# Altium PCB External_Camera_HAT.PcbDoc (part 2 of 3)
Units mm, origin at the board's own origin, x right, y up, seen from the top; angles counter-clockwise.
Board outline 65 x 56 mm, 4 copper layers (Top Layer, GND Top, GND Bottom, Bottom Layer), stack 1.586 mm thick; 123 components, 112 nets, 537 pads, 357 vias.
Unrouted connection lines stored in the file: 85.
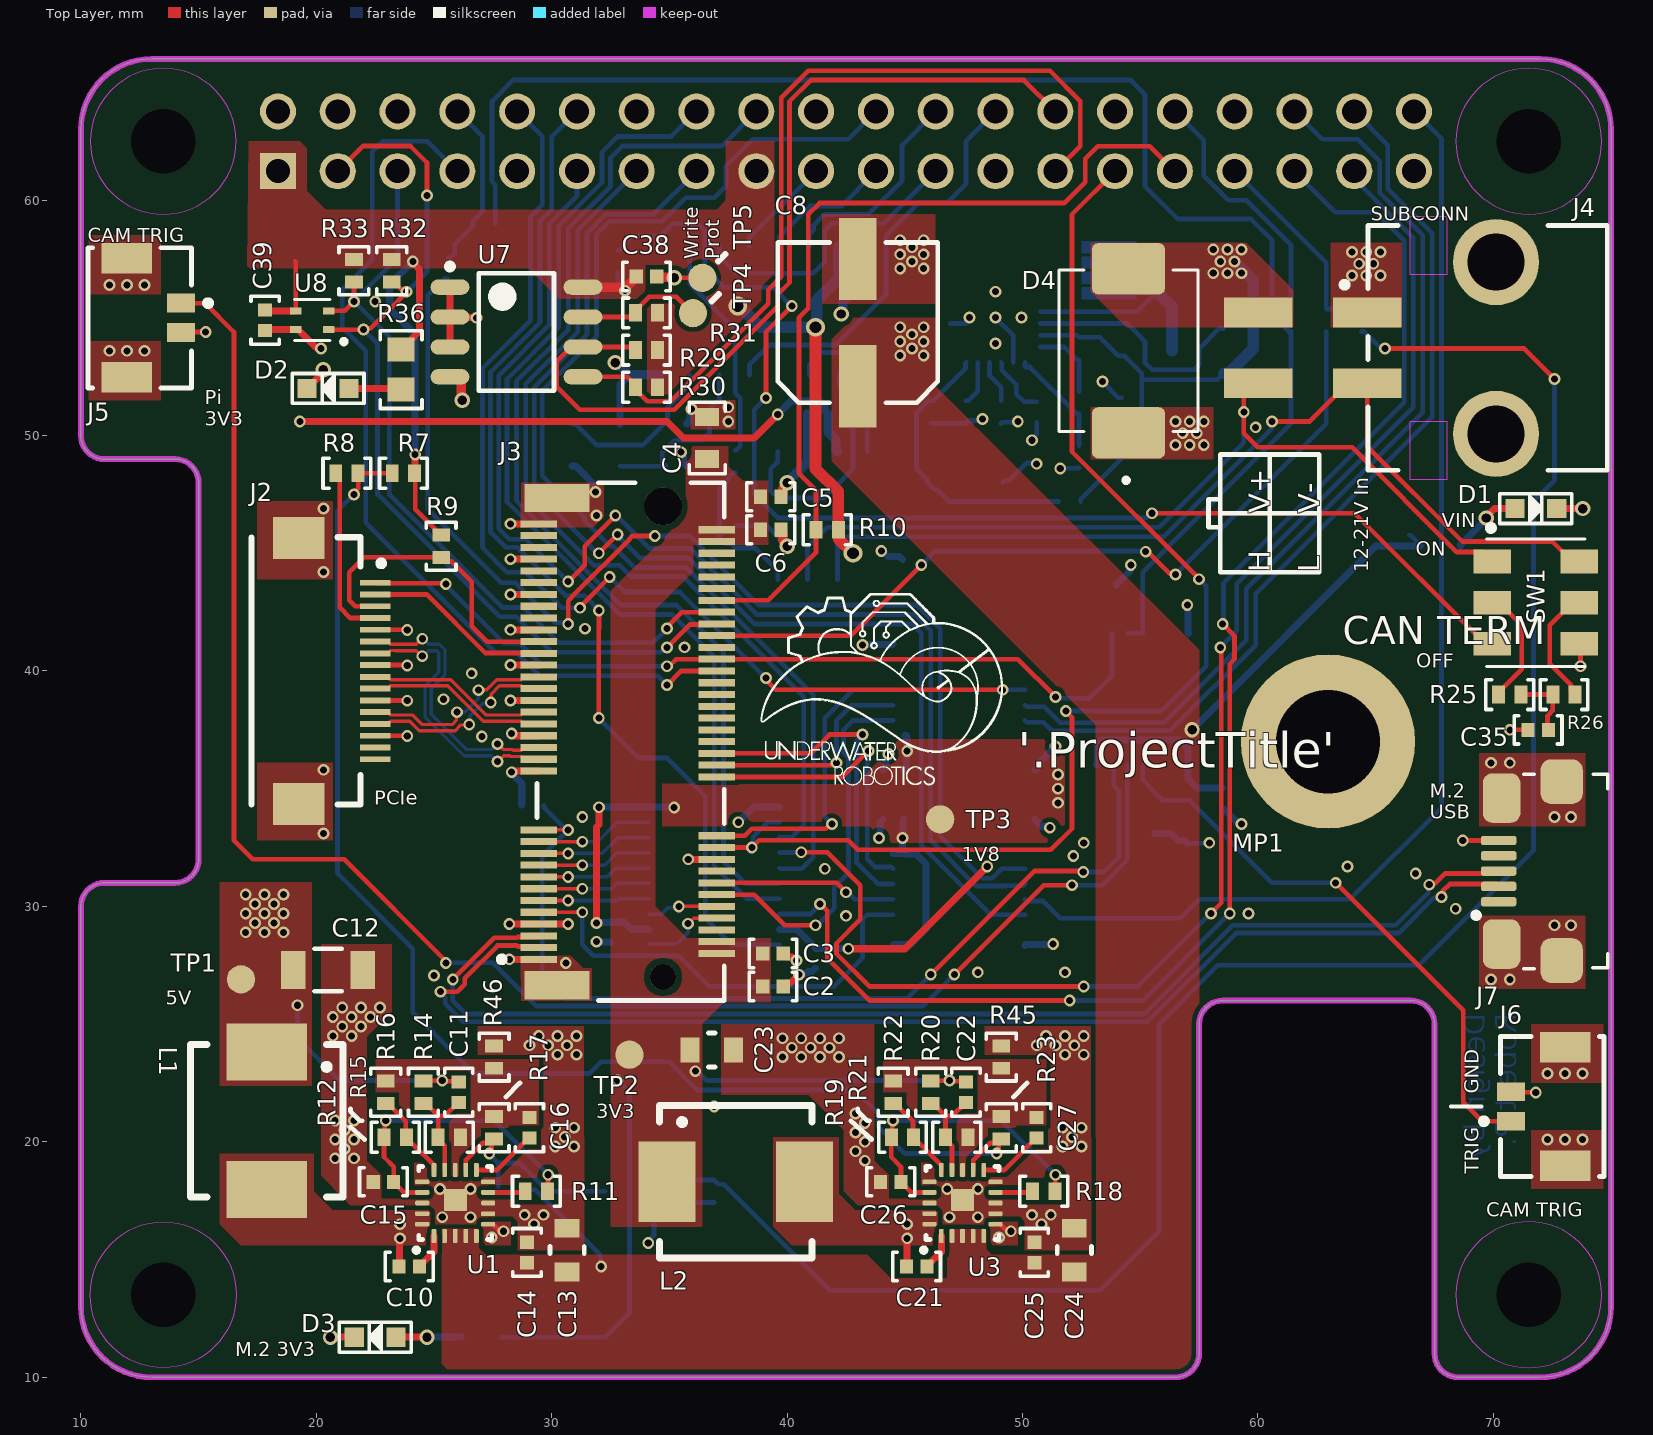
[diagram p0: Top Layer view]

## Via types
v1: diameter 0.5, hole 0.3, Top Layer to Bottom Layer, tented both sides, 342 vias
v2: diameter 0.65, hole 0.4, Top Layer to Bottom Layer, tented both sides, 12 vias
v3: diameter 0.8, hole 0.5, Top Layer to Bottom Layer, tented both sides, 3 vias

## Nets (pads, with @x,y where several pads share a name; then routed paths per layer and width w, separated by ;. In a path a pad name is that pad's centre, name@x,y a point inside that pad or via, vN(x,y) a via of type N, cw(c..) or ccw(c..) an arc to the next point about the centre after c; other vN are vias at no path point) (continued)
CAM_TRIGGER_3V3: R2.1 R4.1 U11.3 U11.4 | length 64.2
  Bottom Layer w0.2: R2.1@27.6,59 27.6,60.654 27.465,60.789 27.465,64.211 28.354,65.1 54.6,65.1 55.2,64.5 55.2,60.6 56.6,59.2 59.7,59.2 60.6,58.3 60.6,55.125 61.3,54.425 R4.1@61.4,54.425 61.4,50.5 55.1,44.2 U11.4@55.1,41.6 U11.3@54.45,41.6
CAN_INT: J1.26 U5.4 | length 17.9
  Bottom Layer w0.2: U5.4@38.4,52.575 38.4,53 39.243,53.843 42.043,53.843 44.2,56 44.2,58.5 45.6,59.9 46.8,59.9 47.6,60.7 47.6,62.52 J1.26@48.85,63.77
CANH: J4.4 SW1.1 U6.7 | length 38.3
  Top Layer w0.2: J4.4@60.011,52.221 59.935,52.221 59.4,51.686 v1(59.4,51) 59.4,50.1 60,49.5 64,49.5 68.45,45.05 69.55,45.05 SW1.1@69.95,44.65
  Bottom Layer w0.2: U6.7@40.865,43.875 40.865,45.256 41.709,46.1 55.8,46.1 59.4,49.7 v1(59.4,51)
CANL: J4.2 SW1.4 U6.6 | length 40.7
  Top Layer w0.2: v1(60.6,50.6) 62.194,50.6 63.816,52.221 J4.2@64.641,52.221 64.641,49.532 68.673,45.5 72.5,45.5 73.35,44.65 SW1.4@73.65,44.65
  Bottom Layer w0.2: U6.6@42.135,43.875 42.135,45.335 42.5,45.7 56,45.7 60.561,50.261 60.561,50.561 v1(60.6,50.6)
CANRX: U5.2 U6.4 | length 6.7
  Bottom Layer w0.2: U5.2@40.94,52.575 40.94,53 41.467,53.527 42.428,53.527 43.405,52.55 U6.4@43.405,49.325
CANSTB: R27.1 R28.1 U6.8 | length 6.5
  Bottom Layer w0.2: R27.1@37.8,48.425 37.7,48.425 37.525,48.25 37.525,48.15 37.125,47.75 37.125,45.675 37.4,45.4 37.625,45.4 R28.1@37.8,45.225 38.627,45.225 39.595,44.257 U6.8@39.595,43.875
CANTX: U5.1 U6.1 | length 10.2
  Bottom Layer w0.2: U6.1@39.595,49.325 39.595,48.878 39.3,48.583 39.3,47.643 39.592,47.352 41.552,47.352 42.8,48.6 42.8,49.8 42.8,51.6 42.21,52.19 U5.1@42.21,52.575
EFUSE_SHDN: D5.2 R39.2 R42.1 U2.12 | length 12.2
  Bottom Layer w0.2: U2.12@47.6,53.1 47.58,53.08 47.58,52.855 46.2,51.475 R42.1@46.1,51.475 46,51.475 45.498,50.973 45.498,48.567 D5.2@45.965,48.1 45.965,47.998 46.25,47.713 46.352,47.713 46.865,47.2 R39.2@51.525,47.2